# Altium PCB SSB23_rev0.PcbDoc (part 1 of 3)
Units mil, origin at the board's own origin, x right, y up, seen from the top; angles counter-clockwise.
Board outline 4555 x 3775 mil, 2 copper layers (Top Layer, Bottom Layer); 91 components, 73 nets, 352 pads, 879 vias.
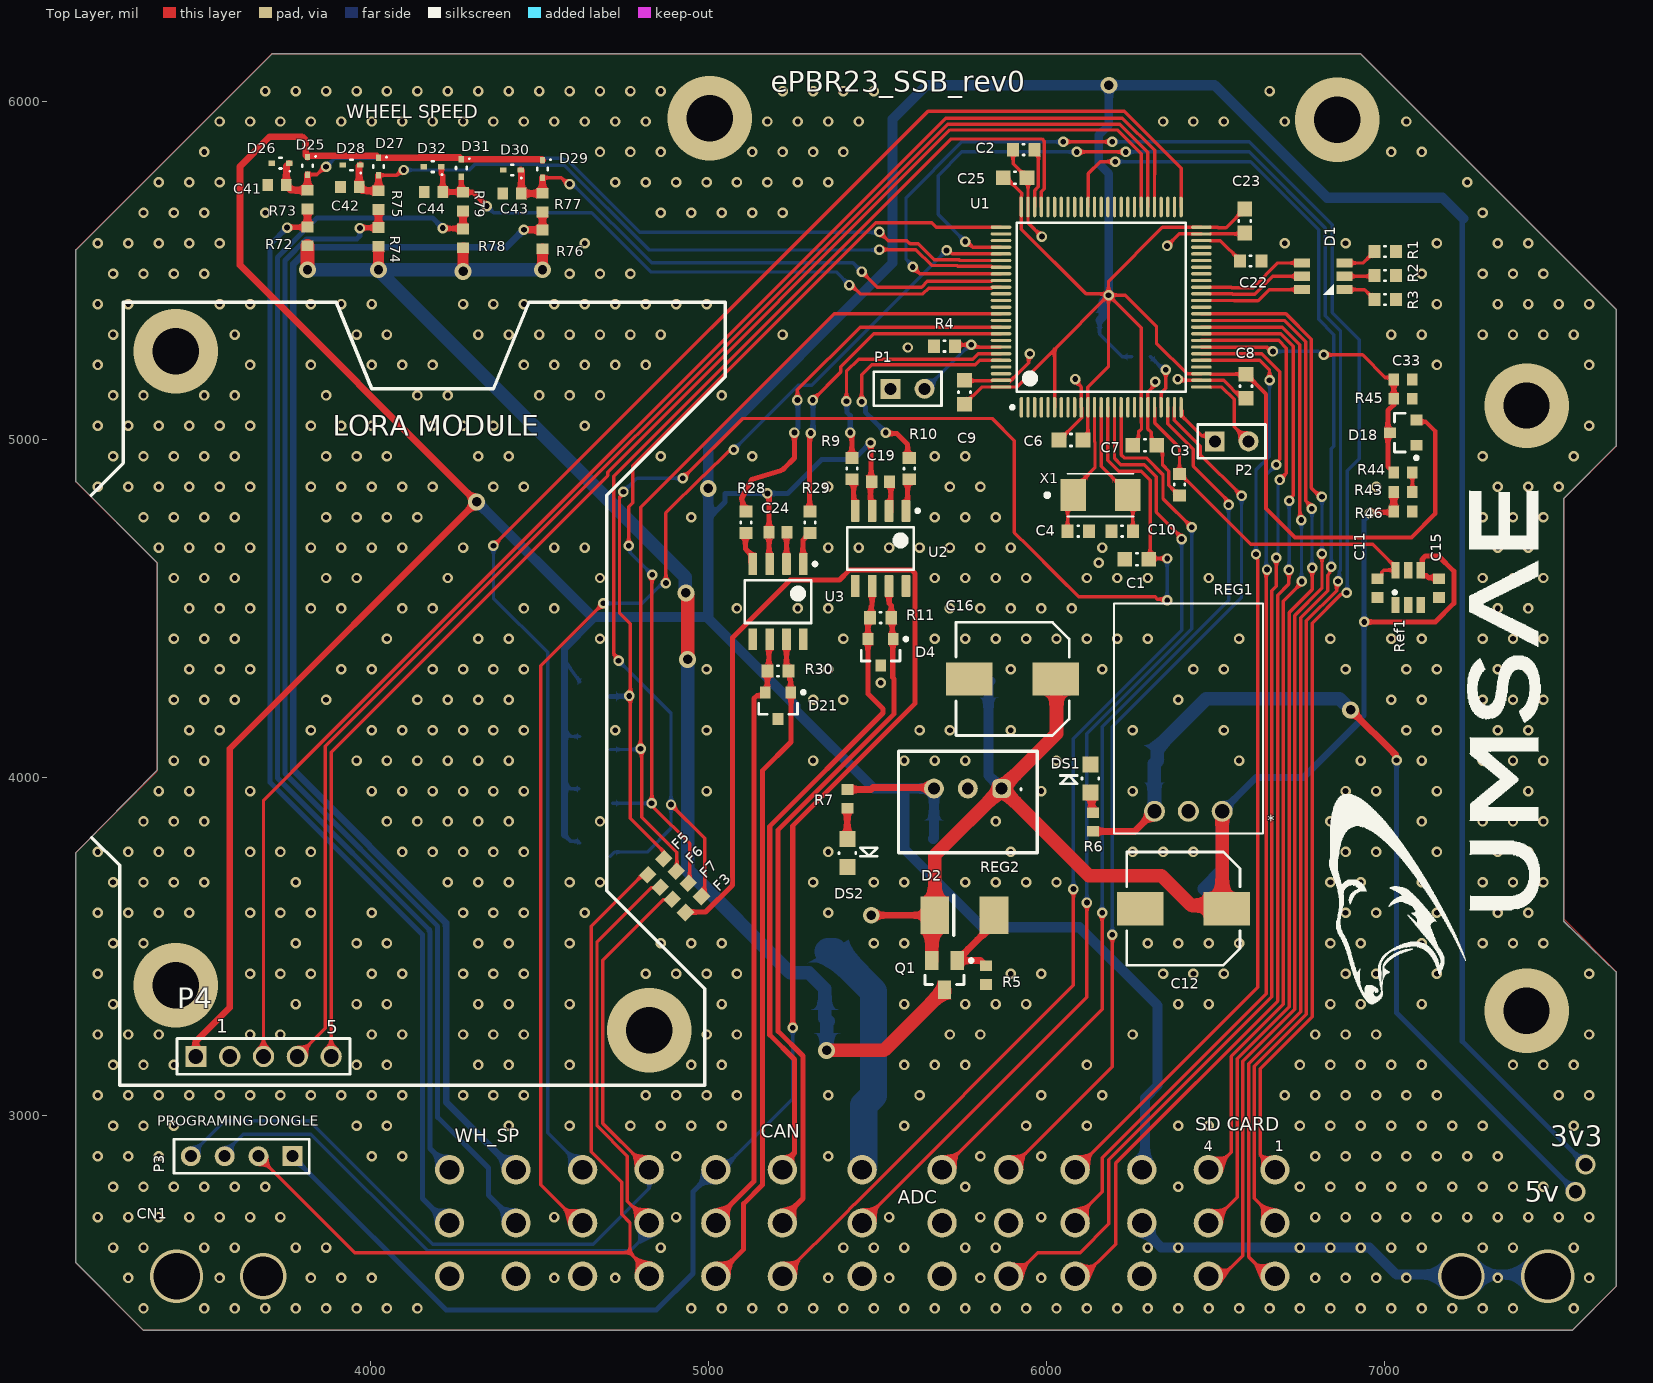
[diagram p0: Top Layer view]
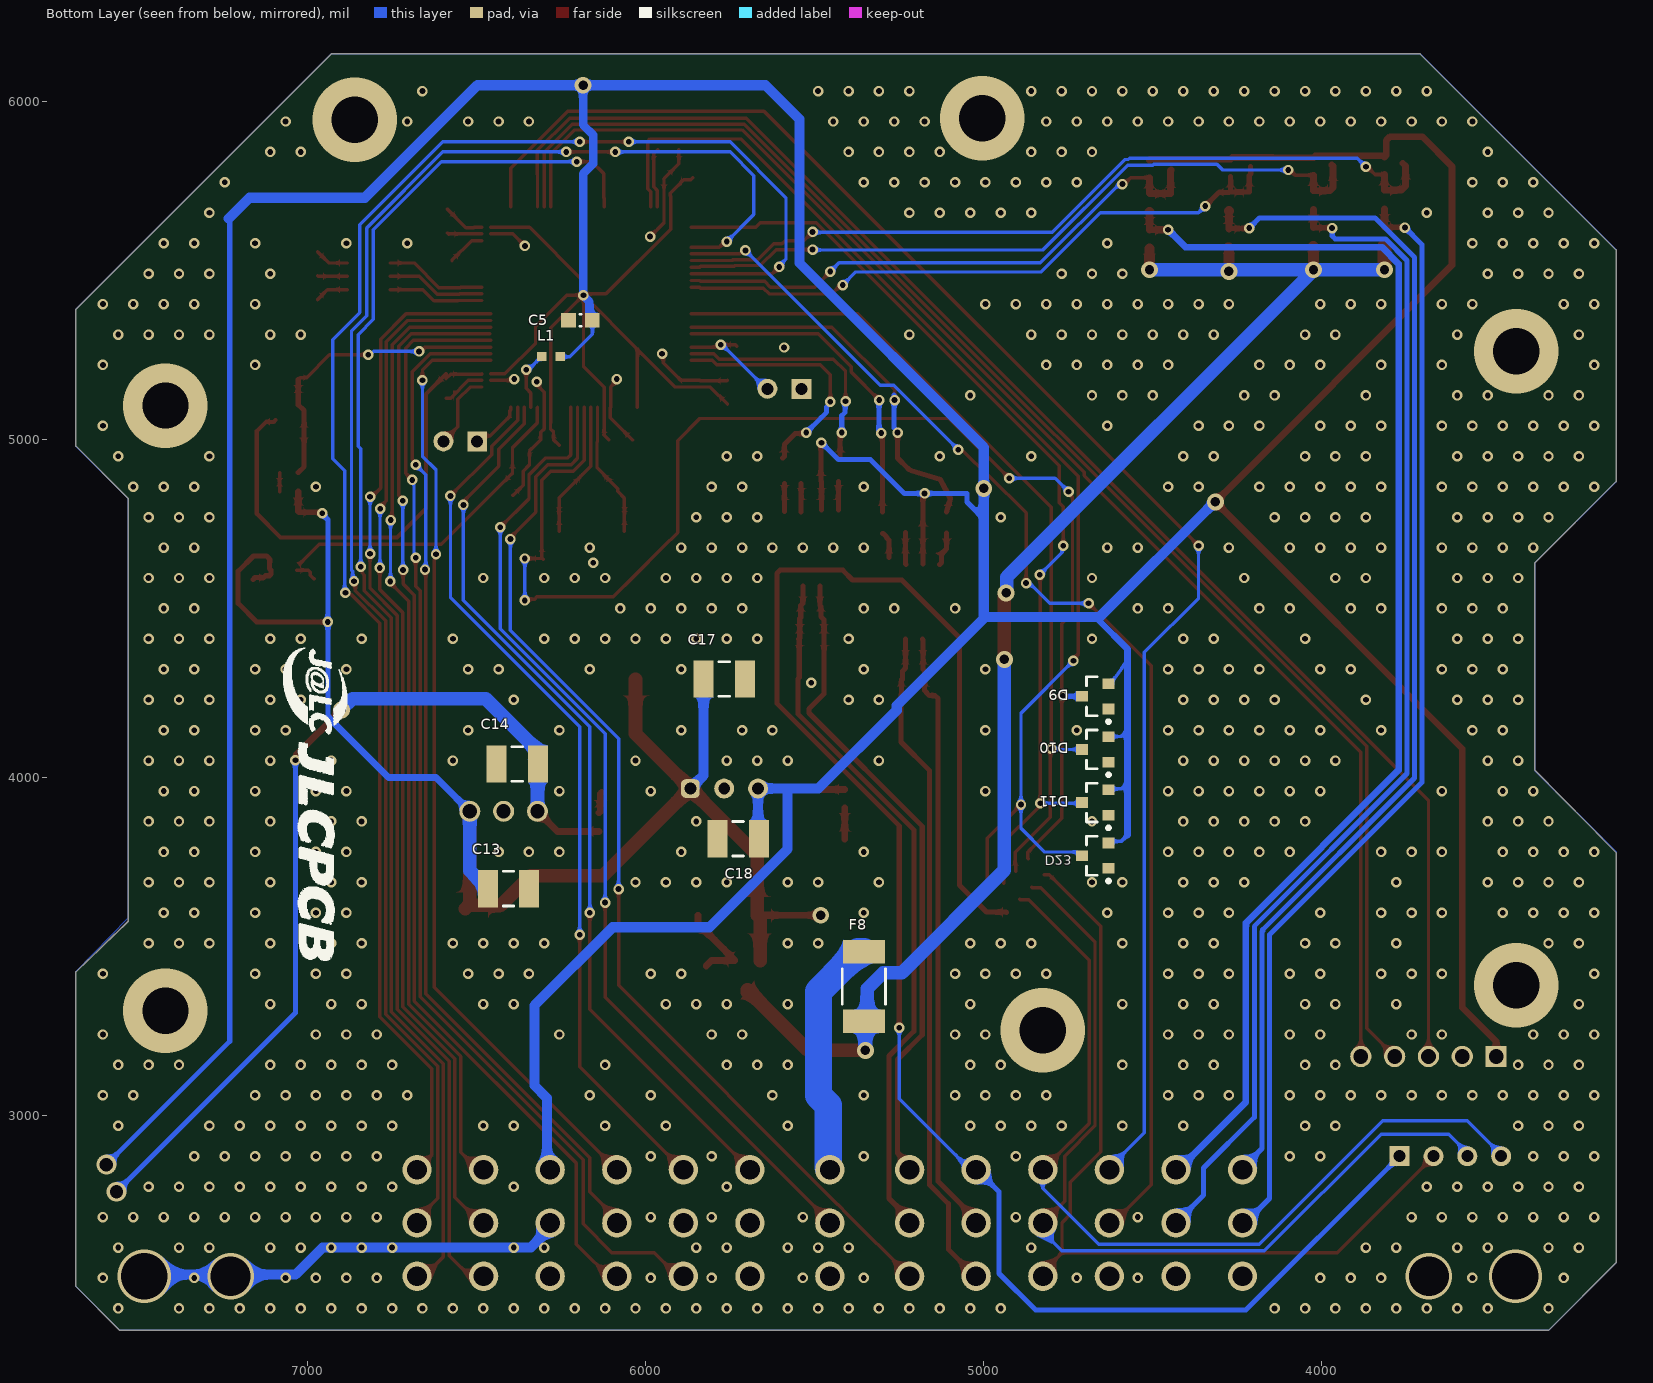
[diagram p1: Bottom Layer view, seen from below]

## Layer stack, top to bottom
Top Solder: solder mask 0.4, Solder Resist, Dk 3.5
Top Layer: signal copper 1.4
Dielectric 1: dielectric 12.6, FR-4, Dk 4.8
Bottom Layer: signal copper 1.4
Bottom Solder: solder mask 0.4, Solder Resist, Dk 3.5

## Board outline
7685,4980 7530,4825 7530,3575 7685,3425 7685,2495 7555,2365 3330,2365 3130,2565 3130,3778.16 3370,4021.69 3370,4635 3130,4875 3130,5560 3710,6140 6930,6140 7685,5385

## Design rules (kind name [scope] priority, off if disabled: settings)
Clearance [All] p1: gap=7 ignorepadtopadclearanceinfootprint=FALSE except(0: Arc-Hole Track-Hole SMDPad-Hole THPad-Hole Via-Hole Fill-Hole Poly-Hole Region-Hole Text-Hole)
DiffPairsRouting [All] p1: maxlimit=10 minlimit=10 mostfreqgap=10 toplayer_minwidth=15 toplayer_maxwidth=15 toplayer_prefwidth=15 bottomlayer_minwidth=15 bottomlayer_maxwidth=15 bottomlayer_prefwidth=15 maxuncoupledlength=500
Height [All] p1: minheight=0 maxheight=39370.08 prefheight=500
HoleSize [All] p1: absolutevalues=TRUE maxlimit=200 minlimit=15 maxpercent=80.000 minpercent=20.000
HoleToHoleClearance [All] p1: gap=8 allowstackedmicrovias=TRUE
MinimumAnnularRing MinimumAnnularRing_Pad [IsPad] p1: minimumring=7
MinimumAnnularRing MinimumAnnularRing_Via [IsVia] p2: minimumring=5
MinimumSolderMaskSliver [All] p1: minsoldermaskwidth=4
PlaneClearance [All] p1: clearance=15
PlaneConnect PlaneConnect_12V [InNet('12V')] p1: planeconnectstyle=Direct reliefexpansion=20 reliefentries=4 reliefconductorwidth=20 reliefairgap=10
PlaneConnect PlaneConnect_1 [All] p2: planeconnectstyle=Relief reliefexpansion=15 reliefentries=4 reliefconductorwidth=15 reliefairgap=10
PolygonConnect [All] p1: connectstyle=Direct reliefconductorwidth=15 reliefentries=4 polygonreliefangle="90 Angle" airgapwidth=10
RoutingVias [All] p1: holewidth=17 width=31 viastyle="Through Hole" minholewidth=15 minwidth=29 maxholewidth=50 maxwidth=100
SilkToSilkClearance [All] p1: silktosilkclearance=7
SilkToSolderMaskClearance [IsPad] p1: minsilkscreentomaskgap=2 clearancetoexposedcopper=TRUE
SolderMaskExpansion [All] p1: expansion=3 istentingtop=FALSE
Width [All] p1: maxlimit=200 minlimit=7 preferedwidth=15
21 further rules are at their usual default settings.

## Classes and differential pairs
component class 6-Sensors: C41 C42 C43 C44 D25 D26 D27 D28 D29 D30 D31 D32 R72 R73 R74 R75 R76 R77 R78 R79
component class 7-Fusing: F8
component class 8-Other_Inputs: C33 D18 R43 R44 R45 R46
component class 5-LORA: P4
component class 4-Connector: CN1 D9 D10 D11 D23 F3 F5 F6 F7 P3
component class 3-CAN: C19 C24 D4 D21 R9 R10 R11 R28 R29 R30 U2 U3
component class 2-Power: C11 C12 C13 C14 C15 C16 C17 C18 D2 DS1 DS2 Q1 R5 R6 R7 Ref1 REG1 REG2
component class 1-Controller: C1 C2 C3 C4 C5 C6 C7 C8 C9 C10 C22 C23 C25 D1 L1 P1 P2 R1 R2 R3 R4 U1
differential pair Sensor_CAN: +Sensor_CAN_P -Sensor_CAN_N
differential pair CAN: +CAN_P -CAN_N

## Components (designator, comment, footprint, x,y, rotation, side; value= is the part's Value field where it differs from the comment)
C1 "CAP 10nF 100V 0603(1608)" CAPC0603(1608)100_M 6267.72,4645.5 r0 top value=10nF
C2 "CAP 2.2uF" CAPC0603(1608)55_N 5933.07,5856.63 r0 top value=2.2uF
C3 "CAP 100nF 25V 0603(1608)" CAPC0603(1608)100_N 6393.7,4866.14 r90 top value=100nF
C4 "CAP 24pF" CAPC0603(1608)100_N 6094.32,4728.35 r180 top value=24pF
C5 "CAP 10nF 100V 0603(1608)" CAPC0603(1608)100_M 6192.91,5352.36 r180 bottom value=10nF
C6 "CAP 10nF 100V 0603(1608)" CAPC0603(1608)100_M 6072.83,4998.03 r0 top value=10nF
C7 "CAP 10nF 100V 0603(1608)" CAPC0603(1608)100_M 6291.34,4982.28 r180 top value=10nF
C8 "CAP 10nF 100V 0603(1608)" CAPC0603(1608)100_M 6590.55,5157.48 r90 top value=10nF
C9 "CAP 10nF 100V 0603(1608)" CAPC0603(1608)100_M 5757.87,5139.76 r270 top value=10nF
C10 "CAP 24pF" CAPC0603(1608)100_N 6224.41,4728.35 r0 top value=24pF
C11 "Cap" 1608[0603] 6979.28,4560 r90 top value=1uF
C12 "UUD1H101MNL1GS" NIC-CAPA2-8X10_V 6405.51,3612.2 r180 top
C13 "Cap" C1210_M 6405.51,3671.26 r0 bottom value=22uF
C14 "Cap" C1210_M 6380,4040 r180 bottom value=10uF
C15 "Cap" 1608[0603] 7160.72,4560 r90 top value=100nF
C16 "UUD1H101MNL1GS" NIC-CAPA2-8X10_V 5900,4291.34 r180 top
C17 "Cap" C1210_M 5767.72,4291.34 r0 bottom value=22uF
C18 "Cap" C1210_M 5726.38,3818.9 r180 bottom value=10uF
C19 "0.1uF" CAPC1608X90X30NL10T20 5509.81,4874.47 r180 top
C22 "CAP 2.2uF 10V 0603(1608)" CAPC0603(1608)55_N 6604.33,5527.56 r180 top value=2.2uF
C23 "CAP 10nF 100V 0603(1608)" CAPC0603(1608)100_M 6586.61,5645.84 r90 top value=10nF
C24 "0.1uF" CAPC1608X90X30NL10T20 5206.57,4725 r180 top
C25 "CAP 10nF 100V 0603(1608)" CAPC0603(1608)100_M 5907.48,5773.79 r180 top value=10nF
C33 "Cap" 1608[0603] 7055,5177.31 r180 top value=0.47uF
C41 "Cap" 1608[0603] 3725,5751.56 r0 top value=100pF
C42 "Cap" 1608[0603] 3940,5746.56 r0 top value=100pF
C43 "Cap" 1608[0603] 4420,5726.56 r0 top value=100pF
C44 "Cap" 1608[0603] 4187.44,5731.56 r0 top value=100pF
CN1 "5-1418363-3" 5-1418363-3 5455.47,2682.52 r0 top
D1 "CLX6F-FKC-CNP1ST1E1BB7D3D3" CLX6C-FKB 6881.89,5482.28 r180 top
D2 "Zener Diode, 5.1V, 5W SMBJ5338B" "DO-214AA (SMB)" 5757.87,3592.52 r180 top
D4 "NUP2105LT1" ONSC-SOT-23-3-318-08_V 5509.81,4370.03 r270 top
D9 "SZNUP1301ML3T1G" ONSC-SOT-23-3-318-08_V 4670.63,4240 r0 bottom
D10 "SZNUP1301ML3T1G" ONSC-SOT-23-3-318-08_V 4670.63,4082.94 r0 bottom
D11 "SZNUP1301ML3T1G" ONSC-SOT-23-3-318-08_V 4670.63,3925.89 r0 bottom
D18 "SZNUP1301ML3T1G" ONSC-SOT-23-3-318-08_V 7055,5020 r180 top
D21 "NUP2105LT1" ONSC-SOT-23-3-318-08_V 5206.57,4212.69 r270 top
D23 "SZNUP1301ML3T1G" ONSC-SOT-23-3-318-08_V 4670.63,3768.83 r0 bottom
D25 "RB521S30T1G" ONSC-SOD-523-2-502-01_V 3815,5809.01 r270 top
D26 "RB521S30T1G" ONSC-SOD-523-2-502-01_V 3735,5816.56 r180 top
D27 "RB521S30T1G" ONSC-SOD-523-2-502-01_V 4025,5807.02 r270 top
D28 "RB521S30T1G" ONSC-SOD-523-2-502-01_V 3945,5811.56 r180 top
D29 "RB521S30T1G" ONSC-SOD-523-2-502-01_V 4510,5799.58 r270 top
D30 "RB521S30T1G" ONSC-SOD-523-2-502-01_V 4420,5796.56 r180 top
D31 "RB521S30T1G" ONSC-SOD-523-2-502-01_V 4270,5802.55 r270 top
D32 "RB521S30T1G" ONSC-SOD-523-2-502-01_V 4185,5806.56 r180 top
DS1 "LTST-C170GKT" LTST-C170GKT_V 6129.92,3997.21 r90 top
DS2 "LTST-C170GKT" LTST-C170GKT_V 5411.42,3776.21 r270 top
F3 "PTC 80 mA" "0603 fuse" 4956.59,3624.37 r225 top
F5 "PTC 80 mA" "0603 fuse" 4845.05,3735.91 r225 top
F6 "PTC 80 mA" "0603 fuse" 4881.42,3699.53 r225 top
F7 "PTC 80 mA" "0603 fuse" 4917.8,3663.16 r225 top
F8 "1812L075/24DR" LFUS-1812L07524DR_V 5354.33,3381.89 r270 bottom
L1 "MH1608-601Y" BOUR-MH1608_V 6280,5245 r0 bottom
P1 "Header 2" HDR1X2 5539.76,5149.61 r0 top
P2 "Header 2" HDR1X2 6498.03,4994.09 r0 top
P3 "Header 4" HDR1X4 3770,2880 r180 top
P4 "61300511121" 61300511121 3685,3175 r0 top
Q1 "FDN340P" FAIR-SSOT3L-3_V 5698.82,3415.35 r270 top
R1 "82R" RESC0603(1608)_N 7001.97,5555.45 r0 top value="82.00 Ohm"
R2 "60R" RESC0603(1608)_N 7001.97,5484.42 r0 top value="60.40 Ohm"
R3 "33R" RESC0603(1608)_N 7001.97,5413.39 r0 top value="33.00 Ohm"
R4 "10K" RESC0603(1608)_N 5698.82,5275.59 r180 top value="10000.00 Ohm"
R5 "Res1" 1608[0603] 5821.03,3415.35 r90 top value=1K
R6 "Res1" 1608[0603] 6137.96,3868.11 r90 top value=180R
R7 "Res1" 1608[0603] 5411.42,3937.01 r270 top value=82R
R9 "22R" RESC0603(1608)_N 5425,4913.5 r90 top value="22.00 Ohm"
R10 "22R" RESC0603(1608)_N 5594.63,4913.5 r90 top value="22.00 Ohm"
R11 "120R" RESC0603(1608)_N 5509.81,4472.56 r0 top value="120.00 Ohm"
R28 "22R" RESC0603(1608)_N 5111.92,4754.53 r90 top value="22.00 Ohm"
R29 "22R" RESC0603(1608)_N 5301.23,4754.53 r90 top value="22.00 Ohm"
R30 "120R" RESC0603(1608)_N 5206.57,4315.22 r0 top value="120.00 Ohm"
R43 "Res1" 1608[0603] 7055,4844.47 r0 top value=39k
R44 "Res1" 1608[0603] 7055,4901.72 r180 top value=2k
R45 "Res1" 1608[0603] 7055,5120.06 r180 top value=10k
R46 "Res1" 1608[0603] 7055,4787.21 r180 top value=10k
R72 "Res1" 1608[0603] 3815,5600.57 r270 top value=1K
R73 "Res1" 1608[0603] 3815,5709.01 r90 top value=1K
R74 "Res1" 1608[0603] 4025,5599.01 r270 top value=1K
R75 "Res1" 1608[0603] 4025,5707.44 r90 top value=1K
R76 "Res1" 1608[0603] 4510,5591.56 r270 top value=1K
R77 "Res1" 1608[0603] 4510,5700 r90 top value=1K
R78 "Res1" 1608[0603] 4275,5594.54 r270 top value=1K
R79 "Res1" 1608[0603] 4275,5702.97 r90 top value=1K
Ref1 "LT6654AHS6-3.3" "TSOT-23 S6" 7070,4560 r90 top
REG1 "OKI-78SR-5" "OKI-78SR-5/1.5-W - Horizontal" 6520,3900 r180 top
REG2 "OKI-78SR-3.3" "Reg - TH, 3 pin, 100 mil Pitch, VTL" 5767.72,3917.32 r180 top
U1 "STM32F446VET7" STM-LQFP100_L 6162.24,5390.98 r90 top
U2 "SN65HVD232DR" D0008A_M 5509.81,4677.45 r270 top
U3 "SN65HVD232DR" D0008A_M 5206.57,4520.11 r270 top
X1 "Comment" XTAL_ECS-80-18-30-JGN-TR 6160,4835 r0 top

## Footprints (in the part's own frame and the unit in brackets; to place one, negate y for a bottom-side part, rotate by r counter-clockwise, add the part's x,y. Pads: shape width x height; smd on the part's side, far side on the other; paste and mask are expansions set on the pad)
5-1418363-3 [mm] "Levyseal 90 degree 39 pin header"
  round 2.2 hole 1.5: 1(31,4) 2(31,0) 3(31,-4) 4(26,4) 5(26,0) 6(26,-4) 7(21,4) 8(21,0) 9(21,-4) 10(16,4) 11(16,0) 12(16,-4) 13(11,4) 14(11,0) 15(11,-4) 16(6,4) 17(6,0) 18(6,-4) 19(0,4) 20(0,0) 21(0,-4) 22(-6,4) 23(-6,0) 24(-6,-4) 25(-11,4) 26(-11,0) 27(-11,-4) 28(-16,4) 29(-16,0) 30(-16,-4) 31(-21,4) 32(-21,0) 33(-21,-4) 34(-26,4) 35(-26,0) 36(-26,-4) 37(-31,4) 38(-31,0) 39(-31,-4)
  body extent -66,-47.4 66,10.4, height 37
"0603 fuse" [mm] "0603 PTC fuse"
  rect 1x0.9 smd: 1(-0.85,0) 2(0.85,0)
  body extent -1,-0.41 1,0.41, height 0.7
1608[0603] [mm] "Chip Capacitor, Body 1.6x0.8mm, IPC High Density"
  rect 0.8x0.9 smd: 1(-0.7,0) 2(0.7,0)
  body extent -0.87,-0.48 0.87,0.48, height 1.3
61300511121 [mm] "Pin Header, pitch 2.54 mm, THT, Vertical, single row, 5p"
  rect 1.6x1.6 hole 1.1: 1(-5.08,0)
  round 1.6 hole 1.1: 2(-2.54,0) 3(0,0) 4(2.54,0) 5(5.08,0)
  silkscreen extent -6.5,-1.35 6.5,1.35, body extent -6.35,-1.27 6.35,1.27, height 8.57
BOUR-MH1608_V [mm] "Chip Bead, 2-Leads, Body 1.6x0.8mm"
  rect 0.7x0.7 smd: 1(-0.7,0) 2(0.7,0)
  body extent -0.8,-0.38 0.8,0.42, height 0.8
C1210_M [mm] "Chip Capacitor, Body 3.2x2.5mm, IPC Low Density"
  rect 1.5x2.8 smd: 1(-1.55,0) 2(1.55,0)
  silkscreen extent -0.4,-1.3 0.4,1.3, body extent -1.7,-1.35 1.7,1.35, height 1.5
CAPC0603(1608)55_N [mm] "Chip Capacitor, Body 1.6x0.8mm, Height 0.55mm, IPC Medium Density"
  rect 0.9x1 smd: 1(-0.8,0) 2(0.8,0)
  silkscreen extent -0.05,-0.4 0.05,0.4, body extent -0.87,-0.48 0.88,0.47, height 0.55
CAPC0603(1608)100_M [mm] "Chip Capacitor, Body 1.6x0.8mm, Height 1.0mm, IPC Low Density"
  rect 1.1x1.1 smd: 1(-0.9,0) 2(0.9,0)
  silkscreen extent -0.05,-0.45 0.05,0.45, body extent -0.87,-0.47 0.88,0.48, height 1
CAPC0603(1608)100_N [mm] "Chip Capacitor, Body 1.6x0.8mm, Height 1.0mm, IPC Medium Density"
  rect 0.9x1 smd: 1(-0.8,0) 2(0.8,0)
  silkscreen extent -0.05,-0.4 0.05,0.4, body extent -0.87,-0.48 0.88,0.47, height 1
CAPC1608X90X30NL10T20 [mm] "Chip Capacitor, 2-Leads, Body 1.70x0.90mm, IPC Medium Density"
  rect 0.85x0.95 smd: 1(-0.675,0) 2(0.675,0)
  body extent -0.85,-0.45 0.85,0.45, height 0.9
CLX6C-FKB [mm] "6-SMD, J-Lead, 1mm"
  rect 1.2x0.7 smd: 1(0,1) 2(0,0) 3(0,-1) 4(3.2,-1) 5(3.2,0) 6(3.2,1)
  silkscreen extent 0.8,0.6 1.6,1.4, body extent -0.1,-1.7 3.3,1.7, height 1
D0008A_M [mm] "SOIC, 8-Leads, Body 5x4mm, Pitch 1.27mm, IPC Low Density"
  rrect15% 1.65x0.65 smd: 1(-2.825,1.905) 2(-2.825,0.635) 3(-2.825,-0.635) 4(-2.825,-1.905) 5(2.825,-1.905) 6(2.825,-0.635) 7(2.825,0.635) 8(2.825,1.905)
  silkscreen extent -2.95,-2.5 1.6,2.91, body extent -3,-2.45 3,2.45, height 1.63
"DO-214AA (SMB)" [mm]
  rect 2.16x2.8 smd: A(-2.225,0) K(2.225,0)
  silkscreen extent 0.8,-1.5 0.8,1.5, body extent -2.87,-1.95 2.88,1.95, height 2.41
FAIR-SSOT3L-3_V [mm] "SOT23, 3-Leads, Body 2.92x1.4mm, Pitch 0.95mm"
  rect 1.4x1 smd: 1(-1.1,0.95) 2(-1.1,-0.95) 3(1.1,0)
  silkscreen extent -1.22,-1.46 0.7,2.13, body extent -1.26,-1.46 1.26,1.46, height 1.12
HDR1X2 [mm] "Connector; Header; 2 Position"
  rect 1.5x1.5 hole 0.9: 1(0,0)
  round 1.5 hole 0.9: 2(2.54,0)
  silkscreen extent -1.27,-1.27 3.81,1.27
HDR1X4 [mm] "Connector; Header; 4 Position"
  rect 1.5x1.5 hole 0.9: 1(0,0)
  round 1.5 hole 0.9: 2(2.54,0) 3(5.08,0) 4(7.62,0)
  silkscreen extent -1.27,-1.27 8.89,1.27
LFUS-1812L07524DR_V [mm] "SMD, 2-Leads, Body 4.55x3.24mm"
  rect 1.78x3.15 smd: 1(-2.615,0) 2(2.615,0)
  silkscreen extent -1.33,-1.62 1.33,1.62, body extent -2.27,-1.62 2.27,1.62, height 1.55
LTST-C170GKT_V [mm] "SMD, 2-Leads, Body 2x1.25mm"
  rect 1.2x1.2 smd: 1(-1.05,0) 2(1.05,0)
  silkscreen extent -0.41,-0.63 0.23,2.25, body extent -1,-0.63 1,0.63, height 1.1
NIC-CAPA2-8X10_V [mm] "Aluminum Electrolytic Capacitor, Diameter 8mm, Height 10.8mm, Pitch 6.5mm"
  rect 3.5x2.5 smd: 1(-3.25,0) 2(3.25,0)
  silkscreen extent -4.25,-4.25 4.25,4.25, body extent -3.99,-3.97 3.99,4, height 10.8
"OKI-78SR-5/1.5-W - Horizontal" [mil]
  round 62 hole 42 mask-1000: 1(0,0) 2(100,0) 3(200,0)
  silkscreen extent -120,-615 320,65, body extent -115,-615 315,55, height 340
ONSC-SOD-523-2-502-01_V [mm] "SOD, 2-Leads, Body 1.2x0.8mm"
  rect 0.48x0.4 smd: 1(-0.66,0) 2(0.66,0)
  silkscreen extent -0.75,-0.4 0.07,0.65, body extent -0.6,-0.4 0.6,0.4, height 0.7
ONSC-SOT-23-3-318-08_V [mm] "SOT23, 3-Leads, Body 2.92x1.3mm, Pitch 0.95mm"
  rect 0.9x0.8 smd: 1(-1,0.95) 2(-1,-0.95) 3(1,0)
  silkscreen extent -1.12,-1.46 0.65,2.03, body extent -0.65,-1.46 0.65,1.46, height 1.11
"Reg - TH, 3 pin, 100 mil Pitch, VTL" [mm] "OKI-78SR"
  rrect50% 1.4x1.4 hole 0.889: 1(-2.54,-1.27)
  round 1.5 hole 0.889: 2(0,-1.27) 3(2.54,-1.27)
  silkscreen extent -5.21,-4.06 5.21,3.56, body extent -5.21,-4.05 5.21,3.68, height 16.51
RESC0603(1608)_N [mm] "Chip Resistor, Body 1.6x0.8mm, IPC Medium Density"
  rect 0.9x1 smd: 1(-0.8,0) 2(0.8,0)
  silkscreen extent -0.05,-0.4 0.05,0.4, body extent -0.85,-0.47 0.85,0.47, height 0.6
STM-LQFP100_L [mm] "Thin QFP, 100-Leads, Body 14x14mm, Pitch 0.5mm, IPC High Density"
  oval 1.55x0.25 smd: 1(-7.525,6) 2(-7.525,5.5) 3(-7.525,5) 4(-7.525,4.5) 5(-7.525,4) 6(-7.525,3.5) 7(-7.525,3) 8(-7.525,2.5) 9(-7.525,2) 10(-7.525,1.5) 11(-7.525,1) 12(-7.525,0.5) 13(-7.525,0) 14(-7.525,-0.5) 15(-7.525,-1) 16(-7.525,-1.5) 17(-7.525,-2) 18(-7.525,-2.5) 19(-7.525,-3) 20(-7.525,-3.5) 21(-7.525,-4) 22(-7.525,-4.5) 23(-7.525,-5) 24(-7.525,-5.5) 25(-7.525,-6) 51(7.525,-6) 52(7.525,-5.5) 53(7.525,-5) 54(7.525,-4.5) 55(7.525,-4) 56(7.525,-3.5) 57(7.525,-3) 58(7.525,-2.5) 59(7.525,-2) 60(7.525,-1.5) 61(7.525,-1) 62(7.525,-0.5) 63(7.525,0) 64(7.525,0.5) 65(7.525,1) 66(7.525,1.5) 67(7.525,2) 68(7.525,2.5) 69(7.525,3) 70(7.525,3.5) 71(7.525,4) 72(7.525,4.5) 73(7.525,5) 74(7.525,5.5) 75(7.525,6)
  oval 0.25x1.55 smd: 26(-6,-7.525) 27(-5.5,-7.525) 28(-5,-7.525) 29(-4.5,-7.525) 30(-4,-7.525) 31(-3.5,-7.525) 32(-3,-7.525) 33(-2.5,-7.525) 34(-2,-7.525) 35(-1.5,-7.525) 36(-1,-7.525) 37(-0.5,-7.525) 38(0,-7.525) 39(0.5,-7.525) 40(1,-7.525) 41(1.5,-7.525) 42(2,-7.525) 43(2.5,-7.525) 44(3,-7.525) 45(3.5,-7.525) 46(4,-7.525) 47(4.5,-7.525) 48(5,-7.525) 49(5.5,-7.525) 50(6,-7.525) 76(6,7.525) 77(5.5,7.525) 78(5,7.525) 79(4.5,7.525) 80(4,7.525) 81(3.5,7.525) 82(3,7.525) 83(2.5,7.525) 84(2,7.525) 85(1.5,7.525) 86(1,7.525) 87(0.5,7.525) 88(0,7.525) 89(-0.5,7.525) 90(-1,7.525) 91(-1.5,7.525) 92(-2,7.525) 93(-2.5,7.525) 94(-3,7.525) 95(-3.5,7.525) 96(-4,7.525) 97(-4.5,7.525) 98(-5,7.525) 99(-5.5,7.525) 100(-6,7.525)
  silkscreen extent -7.65,-6.35 6.35,6.8, body extent -7,-7 7,7, height 1.6
"TSOT-23 S6" [mm]
  rect 1.22x0.62 smd: 1(-1.27,0.95) 2(-1.27,0) 3(-1.27,-0.95) 4(1.35,-0.95) 5(1.35,0) 6(1.35,0.95)
  silkscreen extent -0.43,0.9 -0.21,1.12, body extent -0.85,-1.45 0.89,1.45, height 1
XTAL_ECS-80-18-30-JGN-TR [mm]
  rect 1.9x2.4 smd: 1(-2.05,0) 2(2.05,0)
  silkscreen extent -4.14,-1.6 2.5,1.6

## Part data
C1 C5 C6 C7 C8 C9 C23 C25: library part CMP-1035-02326-1, "CAP 10nF 100V ±20% 0603 (1608 Metric) Thickness 1mm SMD", Case-EIA=0603, Case-Metric=1608, Rated Voltage="100 V", Tolerance=Â±20%, Max Thickness="1 mm", Technology=SMT
C2 C22: library part CMP-1035-02757-1, "CAP 2.2uF 10V ±10% 0603 (1608 Metric) Thickness 0.55mm SMD", Case-EIA=0603, Case-Metric=1608, Rated Voltage="10 V", Supplier Part Number 1=490-4520-1-ND, Tolerance=Â±10%, Max Thickness="0.55 mm", Supplier 1=Digi-Key, Technology=SMT
C3: library part CMP-1035-02589-1, "CAP 100nF 25V ±20% 0603 (1608 Metric) Thickness 1mm SMD", Case-EIA=0603, Case-Metric=1608, Rated Voltage="25 V", Tolerance=Â±20%, Max Thickness="1 mm", Technology=SMT
C4 C10: library part CMP-1035-00843-1, "CAP 24pF 16V ±2% 0603 (1608 Metric) Thickness 1mm SMD", Case-EIA=0603, Case-Metric=1608, Rated Voltage="16 V", Tolerance=Â±2%, Max Thickness="1 mm", Technology=SMT
C11: "Capacitor", Capacitance=1µF, Manufacturer="Murata Electronics North America", Manufacturer Part Number=GRM188R61E105KA12D, Operating Temperature="-55°C ~ 85°C", Package / Case="0603 (1608 Metric)", Ratings=-, Supplier Part Number 1=490-3897-1-ND, Temperature Coefficient=X5R, Tolerance=±10%, Voltage - Rated=25V, Applications="General Purpose", Category=Capacitors, ComponentLink1Description=http://www.murata.com/~/media/webrenewal/support/library/catalog/products/capacitor/mlcc/c02e.pdf, ComponentLink1URL=http://www.murata.com/~/media/webrenewal/support/library/catalog/products/capacitor/mlcc/c02e.pdf, Features=-, Height - Seated (Max)=-, Lead Spacing=-, Lead Style=-, Mounting Type="Surface Mount, MLCC", Packaging="Cut Tape (CT)", Part Status=Active, Pricing 1="1=0.15, 10=0.053, 50=0.0288, 100=0.0242, 250=0.01984, 500=0.01696, 1000=0.0132 (CAD)", RoHS="RoHS Compliant", Size / Dimension="0.063\" L x 0.031\" W (1.60mm x 0.80mm)", Stock 1=4259407, Supplier 1=Digi-Key, Thickness (Max)="0.035\" (0.90mm)"
C12 C16: library part CMP-0687-00073-1, "Aluminum Electrolytic Capacitor, UD Series, Low Impedance, 100 uF, 50 V, + / - 20%, -55 to 105 degC, Chip Type, 8 x 10 mm D x L, Pb-Free, Reel", Capacitance=100µF, ESR (Equivalent Series Resistance)=-, Lifetime @ Temp.="5000 Hrs @ 105°C", Manufacturer=Nichicon, Operating Temperature="-55°C ~ 105°C", Package / Case="Radial, Can - SMD", Rated Capacitance="100 uF", Rated Ripple Current (at 100kHz)="300 mA", Rated Voltage="50 V", Ripple Current=300mA, Supplier Part Number 1=493-2306-1-ND, Tolerance=±20%, Tolerance Rated Capacitance="-20 to 20%", Voltage Rating=50V, Applications="General Purpose", Category=Capacitors, ComponentLink1Description="Manufacturer URL", ComponentLink1URL=http://www.nichicon.co.jp/, ComponentLink2Description=Datasheet, ComponentLink2URL=http://products.nichicon.co.jp/en/pdf/XJA043/e-ud.pdf, ComponentLink3Description="Package Specification", ComponentLink3URL=http://products.nichicon.co.jp/en/pdf/XJA043/e-ud.pdf, ComponentLink4Description=http://nichicon-us.com/english/products/pdfs/e-uud.pdf, ComponentLink4URL=http://nichicon-us.com/english/products/pdfs/e-uud.pdf, DatasheetVersion=08/2012, Diameter="8 mm", Endurance Time="5000 h", Height - Seated (Max)="0.394\" (10.00mm)", Impedance="0.34 Ohm", Lead Spacing=-, Length="10 mm", Manufacturer Part Number=UUD1H101MNL1GS, Mounting Technology="Surface Mount", Mounting Type="Surface Mount", PackageDescription="2-Pin Surface Mount Device, Diameter 8 mm, Height 10 mm, Pitch 6.5 mm", PackageReference=CAPAE-D8H10, Packaging="Cut Tape (CT)", Packing="Dia382mm Reel", PartNumber=UUD1H101MNL1GS, Part Status=Active, Polarization=Polar, Pricing 1="1=0.92, 10=0.685, 25=0.5868, 50=0.5478, 100=0.4696, 250=0.43044 (CAD)", RoHS=TRUE, Size / Dimension="0.315\" Dia (8.00mm)", Stock 1=65948, Supplier 1=Digi-Key, Surface Mount Land Size="0.327\" L x 0.327\" W (8.30mm x 8.30mm)"
C13 C17: "Capacitor", Capacitance=22µF, Manufacturer=Yageo, Manufacturer Part Number=CC1210MKX5R8BB226, Operating Temperature="-55°C ~ 85°C", Package / Case="1210 (3225 Metric)", Ratings=-, Supplier Part Number 1=311-2056-1-ND, Temperature Coefficient=X5R, Tolerance=±20%, Voltage - Rated=25V, Applications="General Purpose", Category=Capacitors, ComponentLink1Description=http://www.yageo.com/documents/recent/UPY-GPHC_X5R_4V-to-50V_23.pdf, ComponentLink1URL=http://www.yageo.com/documents/recent/UPY-GPHC_X5R_4V-to-50V_23.pdf, Failure Rate=-, Features=-, Height - Seated (Max)=-, Lead Spacing=-, Lead Style=-, Mounting Type="Surface Mount, MLCC", Packaging="Cut Tape (CT)", Part Status=Active, Pricing 1="1=1, 10=0.703, 25=0.5996, 50=0.5314, 100=0.4628, 250=0.39424 (CAD)", RoHS="RoHS Compliant", Size / Dimension="0.126\" L x 0.098\" W (3.20mm x 2.50mm)", Stock 1=128, Supplier 1=Digi-Key, Thickness (Max)="0.110\" (2.80mm)"
C14 C18: "Capacitor", Capacitance=10µF, Manufacturer=Yageo, Manufacturer Part Number=CC1210ZKY5V8BB106, Operating Temperature="-30°C ~ 85°C", Package / Case="1210 (3225 Metric)", Ratings=-, Supplier Part Number 1=311-2063-1-ND, Temperature Coefficient="Y5V (F)", Tolerance="-20%, +80%", Voltage - Rated=25V, Applications="General Purpose", Category=Capacitors, ComponentLink1Description=http://www.yageo.com/documents/recent/UPY-GPHC_Y5V_6.3V-to-50V_7.pdf, ComponentLink1URL=http://www.yageo.com/documents/recent/UPY-GPHC_Y5V_6.3V-to-50V_7.pdf, Failure Rate=-, Features=-, Height - Seated (Max)=-, Lead Spacing=-, Lead Style=-, Mounting Type="Surface Mount, MLCC", Packaging="Cut Tape (CT)", Part Status=Active, Pricing 1="1=0.47, 10=0.323, 25=0.258, 50=0.2154, 100=0.1829, 250=0.14528, 500=0.12912, 1000=0.11298 (CAD)", RoHS="RoHS Compliant", Size / Dimension="0.126\" L x 0.098\" W (3.20mm x 2.50mm)", Stock 1=1156, Supplier 1=Digi-Key, Thickness (Max)="0.083\" (2.10mm)"
C15: "Capacitor", Capacitance=0.10µF, Manufacturer=Yageo, Manufacturer Part Number=CC0603KRX7R9BB104, Operating Temperature="-55°C ~ 125°C", Package / Case="0603 (1608 Metric)", Ratings=-, Supplier Part Number 1=311-1344-1-ND, Temperature Coefficient=X7R, Tolerance=±10%, Voltage - Rated=50V, Applications="General Purpose", Category=Capacitors, ComponentLink1Description=http://www.yageo.com/documents/recent/UPY-GPHC_X7R_6.3V-to-50V_16.pdf, ComponentLink1URL=http://www.yageo.com/documents/recent/UPY-GPHC_X7R_6.3V-to-50V_16.pdf, Failure Rate=-, Features=-, Height - Seated (Max)=-, Lead Spacing=-, Lead Style=-, Mounting Type="Surface Mount, MLCC", Packaging="Cut Tape (CT)", Part Status=Active, Pricing 1="1=0.15, 10=0.043, 25=0.0312, 50=0.0232, 100=0.0189, 250=0.0158, 500=0.01346, 1000=0.01059 (CAD)", RoHS="RoHS Compliant", Size / Dimension="0.063\" L x 0.031\" W (1.60mm x 0.80mm)", Stock 1=4016262, Supplier 1=Digi-Key, Thickness (Max)="0.035\" (0.90mm)"
C19 C24: library part CMP-2000-06092-1, "Chip Capacitor, 100 nF, +/- 10%, 50 V, -55 to 125 degC, 0603 (1608 Metric), RoHS, Tape and Reel", Dielectric=X7R, Manufacturer=SamsungElectro-Mechanics, Operating Temperature=-55to125°C, Package/Case=0603, Package Description="2-Pin Surface Mount Device, Body 1.60 x 0.80 mm", Tolerance=10%, Voltage=50Vdc, Capacitance Value=0.1uF, Category=CapacitorCeramicMultilayer, Construction=Flat, Datasheet URL=http://www.samsungsem.com/kr/support/product-search/mlcc/__icsFiles/afieldfile/2016/08/18/S_CL10B104KB8SFNC.pdf, Datasheet Version=06/2016, Manufacturer URL=http://www.samsungsem.com/global/index.jsp, Mounting=SurfaceMount, Mounting Technology=SurfaceMount, Package Reference=0603, Packaging=Tape&Reel, Product Depth=0.8mm, Product Height=0.8mm, Product Length=1.6mm, Rad Hard=No
C33: "Capacitor", Capacitance=0.47µF, Manufacturer=Yageo, Manufacturer Part Number=CC0603KRX7R8BB474, Operating Temperature="-55°C ~ 125°C", Package / Case="0603 (1608 Metric)", Ratings=-, Supplier Part Number 1=311-1805-1-ND, Temperature Coefficient=X7R, Tolerance=±10%, Voltage - Rated=25V, Applications="General Purpose", Category=Capacitors, ComponentLink1Description=http://www.yageo.com/documents/recent/UPY-GPHC_X7R_6.3V-to-50V_16.pdf, ComponentLink1URL=http://www.yageo.com/documents/recent/UPY-GPHC_X7R_6.3V-to-50V_16.pdf, Failure Rate=-, Features=-, Height - Seated (Max)=-, Lead Spacing=-, Lead Style=-, Mounting Type="Surface Mount, MLCC", Packaging="Cut Tape (CT)", Part Status=Active, Pricing 1="1=0.22, 10=0.158, 25=0.1156, 50=0.0898, 100=0.0745, 250=0.06168, 500=0.05226, 1000=0.04324 (CAD)", RoHS="RoHS Compliant", Size / Dimension="0.063\" L x 0.031\" W (1.60mm x 0.80mm)", Stock 1=11076, Supplier 1=Digi-Key, Thickness (Max)="0.035\" (0.90mm)"
C41 C42 C43 C44: "Capacitor", LatestRevisionDate=17-Jul-2002, LatestRevisionNote="Re-released for DXP Platform.", PackageDescription="Radial Cap, Thru-Hole; 2 Leads; 0.3 in Pin Spacing", PackageReference=RAD-0.3, Published=8-Jun-2000, Publisher="Altium Limited"
CN1: "Levyseal 90 degree 39 pin header"
D1: library part "LED - CLX6F-FKC-CNP1ST1E1BB7D3D3", "Red, Green, Blue (RGB) 622nm Red, 530nm Green, 470nm Blue LED Indication - Discrete 2.1V Red, 2.7V Green, 3V Blue 6-SMD, J-Lead", ComponentLink1Description=Digikey, ComponentLink1URL=https://www.digikey.ca/product-detail/en/cree-inc/CLX6F-FKC-CNP1ST1E1BB7D3D3/CLX6F-FKC-CNP1ST1E1BB7D3D3CT-ND/6362814
D2: Part Number=SMBJ5338B, Power=5W, Reverse Voltage=5.1V
D4 D21: library part CMP-1063-00165-1, "Dual Line CAN Bus Protector, 3-Pin SOT-23, Tape and Reel", Manufacturer="On Semiconductor", C Max (pF)=30, ComponentLink1Description="Manufacturer URL", ComponentLink1URL=http://www.onsemi.com/, ComponentLink2Description=Datasheet, ComponentLink2URL=http://www.onsemi.cn/pub_link/Collateral/NUP2105L-D.PDF, ComponentLink3Description="Package Specification", ComponentLink3URL=http://www.onsemi.cn/pub_link/Collateral/318-08.PDF, DatasheetVersion="Rev. 5", Direction=Bidirectional, IR Max (uA)=0.1, Mounting Technology="Surface Mount", Number of Lines=2, PackageDescription="3-Pin Small Outline Transistor, Body 2.92 x 1.3 mm, Pitch 0.95 mm", PackageReference=SOT-23-3-318-08, PackageVersion="Rev. AP, 11/2009", Packing="Tape and Reel", PartNumber=NUP2105LT1, PPK Max (W)=350, V(BR) Min (V)=26.2
D9 D10 D11 D18 D23: library part CMP-1063-00171-1, "Low Capacitance Diode Array for ESD Protection in a Single Data Line, 3-Pin SOT-23, Pb-Free, Tape and Reel", Manufacturer="On Semiconductor", Supplier Part Number 1=863-SZNUP1301ML3T1G, C Max (pF)=0.9, ComponentLink1Description="Manufacturer URL", ComponentLink1URL=http://www.onsemi.com/, ComponentLink2Description=Datasheet, ComponentLink2URL=http://www.onsemi.cn/pub_link/Collateral/NUP1301ML3T1-D.PDF, ComponentLink3Description="Package Specification", ComponentLink3URL=http://www.onsemi.cn/pub_link/Collateral/318-08.PDF, DatasheetVersion="Rev. 6", Direction=Bidirectional, Mounting Technology="Surface Mount", Number of Lines=1, PackageDescription="3-Pin Small Outline Transistor, Body 2.92 x 1.3 mm, Pitch 0.95 mm", PackageReference=SOT-23-3-318-08, PackageVersion="Rev. AP, 11/2009", Packing="Tape and Reel", PartNumber=SZNUP1301ML3T1G, RoHS=Pb-Free, Supplier 1=Mouser, V(BR) Min (V)=70, VRWM Max (V)=70
D25 D26 D27 D28 D29 D30 D31 D32: library part CMP-1051-00018-1, "Schottky Barrier Diode, 2-Pin SOD-523, Pb-Free, Tape and Reel", Manufacturer="On Semiconductor", ComponentLink1Description="Manufacturer URL", ComponentLink1URL=http://www.onsemi.com/, ComponentLink2Description=Datasheet, ComponentLink2URL=http://www.onsemi.cn/pub_link/Collateral/RB521S30T1-D.PDF, ComponentLink3Description="Package Specification", ComponentLink3URL=http://www.onsemi.com/pub_link/Collateral/502-01.PDF, Configuration=Single, DatasheetVersion="Rev. 8", IFSM Max (A)=1, Mounting Technology="Surface Mount", PackageDescription="2-Pin SOD, Body 1.2 x 0.8 mm", PackageReference=SOD-523-2-502-01, PackageVersion="Rev. E, 09/2010", Packing="Tape and Reel", PartNumber=RB521S30T1G, RoHS=TRUE
DS1 DS2: library part CMP-1674-00002-5, "LED Uni-Color Green, 100 mW, 120 mA, -55 to 85 degC, 2-Pin SMD, RoHS, Tape and Reel", Color=Green, Current - Test=10mA, Lens Color=Colorless, Manufacturer=Lite-On, Max Operating Temperature="85 degC", Millicandela Rating=6mcd, Min Operating Temperature="-55 degC", Package / Case="0805 (2012 Metric)", Package Quantity=1, Supplier Device Package=-, Supplier Part Number 1=160-1179-1-ND, Voltage - Forward (Vf) (Typ)=2.1V, Category=Optoelectronics, Colour=Green, ComponentLink1Description="Manufacturer URL", ComponentLink1URL=http://www.us.liteon.com/, ComponentLink2Description=Datasheet, ComponentLink2URL=http://media.digikey.com/pdf/Data%20Sheets/Lite-On%20PDFs/LTST-C170GKT.pdf, DatasheetVersion=03/2003, Features=-, Height="1.1 mm", Height (Max)=1.10mm, Length="2 mm", Lens Style/Size="Rectangle with Flat Top, 1.40mm x 1.25mm", Lens Transparency=Clear, Manufacturer Part Number=LTST-C170GKT, Mount="Surface Mount", Mounting Technology="Surface Mount", Mounting Type="Surface Mount", PackageDescription="2-Pin Surface Mount Device, Body 2 x 1.25 mm", PackageReference=C170GKT, Packaging="Tape and Reel", Part Status=Active, Pins=2, Pricing 1="1=0.48, 10=0.351, 25=0.2588, 100=0.1848, 250=0.12564, 500=0.11086, 1000=0.08684 (CAD)", RoHS="RoHS Compliant", RoHSCompliant=true, Size / Dimension="2.00mm L x 1.25mm W", Stock 1=242288, Supplier 1=Digi-Key, Viewing Angle=130°, Wavelength - Dominant=569nm, Wavelength - Peak=565nm
F3 F5 F6 F7: library part "PTC fuse 80mA 0ZCM0008FF2G", "0ZCM0008FF2G", Supplier Part Number 1=507-1817-1-ND, Supplier 1=Digi-Key
F8: library part CMP-2000-05510-1, "Poly-Fuse(R) Resettable PTC, 24 V, 100 A, -40 to 85 degC, 2-Pin SMD, RoHS, Tape and Reel", Current Rating=100A, Hold Current=0.75A, Manufacturer=Littelfuse, Maximum Voltage=24VDC, Maximum Voltage DC=24V, Operating Temperature Range=-40Cto+85C, Package / Case=1812(4532metric), Package Description="2-Pin Surface Mount Device, Body 4.55 x 3.24 mm", Package Reference=1812L07524DR, Resistance=290mOhms, Trip Current=1.5A, Brand=Littelfuse, Current Rating (Max)=100A, Current Rating - Max=100A, Datasheet URL=http://www.littelfuse.com/~/media/electronics/datasheets/resettable_ptcs/littelfuse_ptc_1812l_datasheet.pdf.pdf, Datasheet Version=02/2016, Dimensions=4.37mmLx3.07mmWx0.75mmH, Factory Pack Quantity=1500, Manufacturer URL=http://www.littelfuse.com/, Mounting Style=SMD/SMT, Mounting Technology=SurfaceMount, Packaging=Reel, Product Category=ResettableFuses-PPTC, RoHS=Details, Series=1812L, Termination Style=SMD/SMT, Type=PolyFuseResettablePTC
L1: library part CMP-2000-06698-1, "Chip Bead, 600 Ohm, 1 A, -55 to 125 degC, 2-Pin SMD (0603), RoHS, Tape and Reel", Current Rating (Max)=1A, DC Resistance (DCR) (Max)=200mOhm, Impedance @ Frequency=600Ohm@100MHz, Manufacturer=Bourns, Operating Temperature=-55°C~125°C, Package / Case=0603(1608Metric), Package Description="2-Pin Surface Mount Device, Body 1.6 x 0.8 mm", Package Reference=0603, Ratings=-, Standard Package=1, Supplier Part Number 1=240-2371-1-ND, Category=Filters, Datasheet URL=http://www.bourns.com/docs/Product-Datasheets/mh.pdf, Datasheet Version=03/2015, EDA / CAD Models=DownloadfromAcceleratedDesigns, Family=FerriteBeadsandChips, Filter Type=Power,SignalLine, Manufacturer URL=http://www.bourns.com/, Mounting Technology=SurfaceMount, Mounting Type=SurfaceMount, Number of Lines=1, Online Catalog=MHSeries, Other Names=MH1608-601YCT, Packaging=CutTape(CT), RoHS Information=MH1608SeriesMaterialDeclaration, Series=MH, Supplier 1=Digi-Key
P1 P2: "Header, 2-Pin", LatestRevisionDate=17-Jul-2002, LatestRevisionNote="Re-released for DXP Platform.", Publisher="Altium Limited"
P3: "Header, 4-Pin", LatestRevisionDate=17-Jul-2002, LatestRevisionNote="Re-released for DXP Platform.", Publisher="Altium Limited"
P4: library part CMP-1502-01068-1, "THT Vertical Pin Header WR-PHD, Pitch 2.54 mm, Single Row, 5 pins", Contact Resistance=20mOhm, Manufacturer="Wurth Elektronik", Operating Temperature=-40to105degC, Rated Current=3A, Withstanding Voltage=500VAC, Working Voltage=250VAC, Datasheet URL=https://katalog.we-online.de/em/datasheet/6130xx11121.pdf, Gender=Male, Manufacturer URL=http://www.we-online.de, Mounting Technology=THT, Orientation=Vertical, Package Reference=61300511121, Packaging=Bag, Part Number=61300511121, Pin Number=5, Pitch=2.54mm, Publisher=WurthElektronik, Row Number=Single
Q1: library part CMP-2100-03638-1, "Single P-Channel, Logic Level, PowerTrench(R) MOSFET, 2 A, 20 V, -55 to 150 degC, 3-Pin SOT-23, RoHS, Tape and Reel", Case/Package=SOT-23, Continuous Drain Current (ID)=2A, Current Rating=-2A, Drain to Source Breakdown Voltage=-20V, Drain to Source Resistance=60mOhm, Drain to Source Voltage (Vdss)=20V, Gate to Source Voltage (Vgs)=8V, Input Capacitance=779pF, Manufacturer="Fairchild Semiconductor", Max Operating Temperature=150degC, Max Power Dissipation=500mW, Min Operating Temperature=-55degC, Package Description="3-Pin Small Outline Transistor, Body 2.92 x 1.4 mm, Pitch 0.95 mm", Package Quantity=1, Package Reference=SSOT3L, Package Version="Rev. 3, 05/2015", Threshold Voltage=-800mV, Contact Plating=Tin, Datasheet URL=https://www.fairchildsemi.com/datasheets/FD/FDN340P.pdf, Datasheet Version="Rev. E1, 02/2007", Element Configuration=Single, Fall Time=11ns, Height=0.94mm, Lead Free=LeadFree, Length=2.92mm, Manufacturer URL=https://www.fairchildsemi.com/, Mount=SurfaceMount, Number of Elements=1, Number of Pins=3, Package URL=https://www.fairchildsemi.com/package-drawings/MA/MA03B.pdf, Packaging=TapeandReel, Power Dissipation=500mW, Radiation Hardening=No, Rds On Max=70mOhm, REACH SVHC=NoSVHC, Rise Time=9ns, RoHSCompliant=true, Termination=SMD/SMT, Turn-Off Delay Time=27ns, Turn-On Delay Time=10ns, Voltage Rating (DC)=-20V, Width=3.05mm
R1: library part CMP-1012-00048-1, "82R 0.1W 5% 0603 (1608 Metric)  SMD", Case-EIA=0603, Case-Metric=1608, Power="0.1 W", Tolerance="5 %", Technology=SMT
R2: library part CMP-1012-00372-1, "60R4 0.1W 1% 0603 (1608 Metric)  SMD", Case-EIA=0603, Case-Metric=1608, Power="0.1 W", Tolerance="1 %", Technology=SMT
R3: library part CMP-1012-00038-1, "33R 0.1W 5% 0603 (1608 Metric)  SMD", Case-EIA=0603, Case-Metric=1608, Power="0.1 W", Tolerance="5 %", Technology=SMT
R4: library part CMP-1012-00098-1, "10K 0.1W 5% 0603 (1608 Metric)  SMD", Case-EIA=0603, Case-Metric=1608, Power="0.1 W", Tolerance="5 %", Technology=SMT
R5: "Resistor", Manufacturer="Panasonic Electronic Components", Manufacturer Part Number=ERJ-PA3F1001V, Operating Temperature="-55°C ~ 155°C", Package / Case="0603 (1608 Metric)", Power (Watts)="0.25W, 1/4W", Resistance (Ohms)=1k, Supplier Device Package=0603, Supplier Part Number 1=P1.0KBYCT-ND, Temperature Coefficient=±100ppm/°C, Tolerance=±1%, Category=Resistors, ComponentLink1Description=https://industrial.panasonic.com/cdbs/www-data/pdf/RDA0000/AOA0000C243.pdf, ComponentLink1URL=https://industrial.panasonic.com/cdbs/www-data/pdf/RDA0000/AOA0000C243.pdf, Composition="Thick Film", Failure Rate=-, Features="Automotive AEC-Q200, Pulse Withstanding", Height - Seated (Max)="0.022\" (0.55mm)", Number of Terminations=2, Packaging="Cut Tape (CT)", Part Status=Active, Pricing 1="1=0.22, 10=0.198, 25=0.138, 50=0.1072, 100=0.0765, 250=0.05972, 500=0.04746, 1000=0.03368 (CAD)", RoHS="RoHS Compliant", Size / Dimension="0.063\" L x 0.031\" W (1.60mm x 0.80mm)", Stock 1=56110, Supplier 1=Digi-Key
R6: "Resistor", Manufacturer=Yageo, Manufacturer Part Number=RC0603JR-07180RL, Operating Temperature="-55°C ~ 155°C", Package / Case="0603 (1608 Metric)", Power (Watts)="0.1W, 1/10W", Resistance (Ohms)=180, Supplier Device Package=0603, Supplier Part Number 1=311-180GRCT-ND, Temperature Coefficient=±100ppm/°C, Tolerance=±5%, Category=Resistors, ComponentLink1Description=http://www.yageo.com/NewPortal/yageodocoutput?fileName=/pdf/R-Chip/PYu-RC_Group_51_RoHS_L_4.pdf, ComponentLink1URL=http://www.yageo.com/NewPortal/yageodocoutput?fileName=/pdf/R-Chip/PYu-RC_Group_51_RoHS_L_4.pdf, Composition="Thick Film", Failure Rate=-, Features="Moisture Resistant", Height - Seated (Max)="0.022\" (0.55mm)", Number of Terminations=2, Packaging="Cut Tape (CT)", Part Status=Active, Pricing 1="1=0.16, 10=0.016, 25=0.0112, 50=0.0084, 100=0.0062, 250=0.0048, 500=0.00382, 1000=0.00281 (CAD)", RoHS="RoHS Compliant", Size / Dimension="0.063\" L x 0.031\" W (1.60mm x 0.80mm)", Stock 1=201936, Supplier 1=Digi-Key
R7: "Resistor", Manufacturer=Yageo, Manufacturer Part Number=RC0603JR-0782RL, Operating Temperature="-55°C ~ 155°C", Package / Case="0603 (1608 Metric)", Power (Watts)="0.1W, 1/10W", Resistance (Ohms)=82, Supplier Device Package=0603, Supplier Part Number 1=311-82GRCT-ND, Temperature Coefficient=±100ppm/°C, Tolerance=±5%, Category=Resistors, ComponentLink1Description=http://www.yageo.com/NewPortal/yageodocoutput?fileName=/pdf/R-Chip/PYu-RC_Group_51_RoHS_L_4.pdf, ComponentLink1URL=http://www.yageo.com/NewPortal/yageodocoutput?fileName=/pdf/R-Chip/PYu-RC_Group_51_RoHS_L_4.pdf, Composition="Thick Film", Failure Rate=-, Features="Moisture Resistant", Height - Seated (Max)="0.022\" (0.55mm)", Number of Terminations=2, Packaging="Cut Tape (CT)", Part Status=Active, Pricing 1="1=0.16, 10=0.016, 25=0.0112, 50=0.0084, 100=0.0062, 250=0.0048, 500=0.00382, 1000=0.00281 (CAD)", RoHS="RoHS Compliant", Size / Dimension="0.063\" L x 0.031\" W (1.60mm x 0.80mm)", Stock 1=72049, Supplier 1=Digi-Key
R9 R10 R28 R29: library part CMP-1012-00034-1, "22R 0.1W 5% 0603 (1608 Metric)  SMD", Case-EIA=0603, Case-Metric=1608, Power="0.1 W", Tolerance="5 %", Technology=SMT
R11 R30: library part CMP-1012-00052-1, "120R 0.1W 5% 0603 (1608 Metric)  SMD", Case-EIA=0603, Case-Metric=1608, Power="0.1 W", Tolerance="5 %", Technology=SMT
R43: "Resistor", Manufacturer=Yageo, Manufacturer Part Number=RT0603BRD0739KL, Operating Temperature="-55°C ~ 155°C", Package / Case="0603 (1608 Metric)", Power (Watts)="0.1W, 1/10W", Resistance (Ohms)=39k, Supplier Device Package=0603, Supplier Part Number 1=YAG1649CT-ND, Temperature Coefficient=±25ppm/°C, Tolerance=±0.1%, Category=Resistors, ComponentLink1Description=http://www.yageo.com/documents/recent/PYu-RT_1-to-0.05_RoHS_L_6.pdf, ComponentLink1URL=http://www.yageo.com/documents/recent/PYu-RT_1-to-0.05_RoHS_L_6.pdf, Composition="Thin Film", Failure Rate=-, Features="Moisture Resistant", Height - Seated (Max)="0.022\" (0.55mm)", Number of Terminations=2, Packaging="Cut Tape (CT)", Part Status=Active, Pricing 1="1=0.55, 10=0.464, 25=0.3376, 50=0.2446, 100=0.1814, 250=0.1392, 500=0.10966, 1000=0.07592 (CAD)", RoHS="RoHS Compliant", Size / Dimension="0.063\" L x 0.031\" W (1.60mm x 0.80mm)", Stock 1=2740, Supplier 1=Digi-Key
R44: "Resistor", Manufacturer=Yageo, Manufacturer Part Number=AT0603BRD072KL, Operating Temperature="-55°C ~ 155°C", Package / Case="0603 (1608 Metric)", Power (Watts)="0.1W, 1/10W", Resistance (Ohms)=2k, Supplier Device Package=0603, Supplier Part Number 1=YAG2112CT-ND, Temperature Coefficient=±25ppm/°C, Tolerance=±0.1%, Category=Resistors, ComponentLink1Description=http://www.yageo.com/documents/recent/PYu-AT_51_RoHS_L-3.pdf, ComponentLink1URL=http://www.yageo.com/documents/recent/PYu-AT_51_RoHS_L-3.pdf, Composition="Thin Film", Failure Rate=-, Features="Anti-Sulfur, Automotive AEC-Q200, Moisture Resistant", Height - Seated (Max)="0.022\" (0.55mm)", Number of Terminations=2, Packaging="Cut Tape (CT)", Part Status=Active, Pricing 1="1=0.59, 10=0.431, 25=0.3188, 50=0.235, 100=0.1725, 250=0.14248, 500=0.11746, 1000=0.08498 (CAD)", RoHS="RoHS Compliant", Size / Dimension="0.063\" L x 0.032\" W (1.60mm x 0.80mm)", Stock 1=1218, Supplier 1=Digi-Key
R45: "Resistor", Manufacturer=Yageo, Manufacturer Part Number=RT0603BRD0710KL, Operating Temperature="-55°C ~ 155°C", Package / Case="0603 (1608 Metric)", Power (Watts)="0.1W, 1/10W", Resistance (Ohms)=10k, Supplier Device Package=0603, Supplier Part Number 1=YAG1236CT-ND, Temperature Coefficient=±25ppm/°C, Tolerance=±0.1%, Category=Resistors, ComponentLink1Description=http://www.yageo.com/documents/recent/PYu-RT_1-to-0.05_RoHS_L_6.pdf, ComponentLink1URL=http://www.yageo.com/documents/recent/PYu-RT_1-to-0.05_RoHS_L_6.pdf, Composition="Thin Film", Failure Rate=-, Features="Moisture Resistant", Height - Seated (Max)="0.022\" (0.55mm)", Number of Terminations=2, Packaging="Cut Tape (CT)", Part Status=Active, Pricing 1="1=0.5, 10=0.42, 25=0.3048, 50=0.2212, 100=0.164, 250=0.12592, 500=0.0992, 1000=0.06867 (CAD)", RoHS="RoHS Compliant", Size / Dimension="0.063\" L x 0.031\" W (1.60mm x 0.80mm)", Stock 1=2958, Supplier 1=Digi-Key
R46: "Resistor", Manufacturer=Yageo, Manufacturer Part Number=RC0603JR-0710KL, Operating Temperature="-55°C ~ 155°C", Package / Case="0603 (1608 Metric)", Power (Watts)="0.1W, 1/10W", Resistance (Ohms)=10k, Supplier Device Package=0603, Supplier Part Number 1=311-10KGRCT-ND, Temperature Coefficient=±100ppm/°C, Tolerance=±5%, Category=Resistors, ComponentLink1Description=http://www.yageo.com/NewPortal/yageodocoutput?fileName=/pdf/R-Chip/PYu-RC_Group_51_RoHS_L_4.pdf, ComponentLink1URL=http://www.yageo.com/NewPortal/yageodocoutput?fileName=/pdf/R-Chip/PYu-RC_Group_51_RoHS_L_4.pdf, Composition="Thick Film", Failure Rate=-, Features="Moisture Resistant", Height - Seated (Max)="0.022\" (0.55mm)", Number of Terminations=2, Packaging="Cut Tape (CT)", Part Status=Active, Pricing 1="1=0.16, 10=0.016, 25=0.0112, 50=0.0084, 100=0.0062, 250=0.0048, 500=0.00382, 1000=0.00281 (CAD)", RoHS="RoHS Compliant", Size / Dimension="0.063\" L x 0.031\" W (1.60mm x 0.80mm)", Stock 1=2936292, Supplier 1=Digi-Key
R72 R73 R74 R75 R76 R77 R78 R79: "Resistor", LatestRevisionDate=17-Jul-2002, LatestRevisionNote="Re-released for DXP Platform.", PackageDescription="Axial Device, Thru-Hole; 2 Leads; 0.3 in Pin Spacing", PackageReference=AXIAL-0.3, Published=8-Jun-2000, Publisher="Altium Limited"
Ref1: Current - Cathode=-, Current - Output=10mA, Current - Supply=600µA, Digikey Part Number=LT6654AHS6-3.3#TRMPBFCT-ND, Manufacturer="Linear Technology", Operating Temperature="-40°C ~ 125°C (TA)", Package / Case="SOT-23-6 Thin, TSOT-23-6", Supplier Device Package=TSOT-23-6, Temperature Coefficient=10ppm/°C, Tolerance=±0.05%, Voltage - Input="3.8 V ~ 36 V", Voltage - Output (Min/Fixed)=3.3V, Category="Integrated Circuits (ICs)", ComponentLink1Description=http://www.linear.com/docs/29677, ComponentLink1URL=http://www.linear.com/docs/29677, Digikey Link=http://www.digikey.com/product-detail/en/linear-technology/LT6654AHS6-3.3-TRMPBF/LT6654AHS6-3.3-TRMPBFCT-ND/2485839, Manufacturer Part Number=LT6654AHS6-3.3, Mounting Type="Surface Mount", Noise - 0.1Hz to 10Hz=1.7ppmp-p, Noise - 10Hz to 10kHz=2ppmrms, Output Type=Fixed, Packaging="Cut Tape (CT)", Part Status=Active, Pricing 1="1=9.53, 25=8.508, 100=5.5596, 250=5.1048 (CAD)", Reference Type=Series, RoHS="RoHS Compliant", Stock 1=1315, Supplier 1=Digi-Key, Supplier Part Number 1=LT6654AHS6-3.3#TRMPBFCT-ND, Voltage - Output (Max)=-
REG1: "5V DCDC", Current - Output (Max)=1.5A, Manufacturer="Murata Power Solutions Inc.", Manufacturer Part Number=OKI-78SR-3.3/1.5-W36H-C, Operating Temperature="-40°C ~ 85°C", Package / Case="3-SIP Module", Power (Watts) - Manufacture Series=5W, Supplier Part Number 1=811-2196-5-ND, Voltage - Input (Max)=36V, Voltage - Input (Min)=7V, Voltage - Isolation=-, Voltage - Output 1=5V, Applications="ITE (Commercial)", Category="Power Supplies - Board Mount", ComponentLink1Description=http://power.murata.com/data/power/oki-78sr.pdf, ComponentLink1URL=http://power.murata.com/data/power/oki-78sr.pdf, Efficiency=85.5%, Features=SCP, Mounting Type="Through Hole", Number of Outputs=1, Packaging=Tray, Part Status=Active, Pricing 2="1=6.31, 5=6.248, 10=6.205, 25=6.1168, 50=5.9262, 100=5.5449, 250=5.28716 (CAD)", RoHS="RoHS Compliant", Size / Dimension="0.65\" L x 0.41\" W x 0.30\" H (16.5mm x 10.4mm x 7.6mm)", Stock 2=4108, Supplier 1=Digi-Key, Supplier 2=Digi-Key, Supplier Part Number 2=811-3014-ND, Type="Linear Regulator Replacement", Voltage - Output 2=-, Voltage - Output 3=-
REG2: library part OKI-78SR-5, "3.3V DCDC", Current - Output (Max)=1.5A, Manufacturer="Murata Power Solutions Inc.", Manufacturer Part Number=OKI-78SR-3.3/1.5-W36H-C, Operating Temperature="-40°C ~ 85°C", Package / Case="3-SIP Module", Power (Watts) - Manufacture Series=5W, Supplier Part Number 1=811-2196-5-ND, Voltage - Input (Max)=36V, Voltage - Input (Min)=7V, Voltage - Isolation=-, Voltage - Output 1=3.3V, Applications="ITE (Commercial)", Category="Power Supplies - Board Mount", ComponentLink1Description=http://power.murata.com/data/power/oki-78sr.pdf, ComponentLink1URL=http://power.murata.com/data/power/oki-78sr.pdf, Efficiency=85.5%, Features=SCP, Mounting Type="Through Hole", Number of Outputs=1, Packaging=Tray, Part Status=Active, Pricing 2="1=6.31, 5=6.248, 10=6.205, 25=6.1168, 50=5.9262, 100=5.5449, 250=5.28716 (CAD)", RoHS="RoHS Compliant", Size / Dimension="0.65\" L x 0.41\" W x 0.30\" H (16.5mm x 10.4mm x 7.6mm)", Stock 2=4108, Supplier 1=Digi-Key, Supplier 2=Digi-Key, Supplier Part Number 2=811-3014-ND, Type="Linear Regulator Replacement", Voltage - Output 2=-, Voltage - Output 3=-
U1: library part CMP-0243-00221-1, "ARM Cortex-M4 32-bit MCU+FPU, 512 KB Flash, 128 KB Internal RAM, 81 I/Os, 100-Pin LQFP, -40 to 105 degC, Tray", I/Os (High Current)=81, Operating Frequency(F) (Processor speed) (MHz)=180, Package Description=LQFP100, Package Reference="100-Pin Low Profile Quad Flat Package, Body 14 x 14 mm, Pitch 0.5 mm", Supply Voltage(Vcc) min (V)=1.7, ComponentLink1Description="Manufacturer URL", ComponentLink1URL=http://www.st.com/, ComponentLink2Description=Datasheet, ComponentLink2URL=http://www.st.com/st-web-ui/static/active/en/resource/technical/document/datasheet/DM00141306.pdf, Core="ARM Cortex-M4", D/A Converter=2, DatasheetVersion="Rev. 6", FLASH Size (Prog) (kB)=512, Internal RAM Size (kB)=128, Mounting Technology="Surface Mount", Packing=Tray, PartId=1
U2 U3: library part CMP-0315-00075-2, "3.3 V Can Transceiver, 17 mA, -40 to 85 degC, 8-pin SOIC (D), Green (RoHS & no Sb/Br)", Drivers Per Package=1, Manufacturer="Texas Instruments", Rating=Catalog, Supply Voltage(s)(V)=3.3, Code_JEDEC=MS-012AA, ComponentLink1Description=Datasheet, ComponentLink1URL=http://www.ti.com/general/docs/lit/getliterature.tsp?genericPartNumber=SN65HVD232&fileType=pdf, DatasheetVersion=SLOS346K, Eco-Plan="Green (RoHS & no Sb/Br)", ICC(Max)(mA)=17, Isolated=No, Mounting Technology="Surface Mount", PackageDescription="8-Pin Plastic Small Outline Integrated Circuit, 4.9 x 3.9 mm, Pitch 1.27 mm Pitch", PackageReference=D0008A, PackageVersion="revM, Jun-2011", PartNumber=SN65HVD232DR, Receivers Per Package=1, SubFamily=CAN, Transient Pulse Protection(V)="-25 to 25"

## Via types
v1: diameter 31, hole 17, Top Layer to Bottom Layer, 854 vias
v2: diameter 50, hole 28, Top Layer to Bottom Layer, 12 vias
v3: diameter 250, hole 137, Top Layer to Bottom Layer, 7 vias
v4: diameter 157.48, hole 137.8, Top Layer to Bottom Layer, 2 vias
v5: diameter 137.8, hole 118.11, Top Layer to Bottom Layer, 2 vias
v6: diameter 59.06, hole 39.37, Top Layer to Bottom Layer, 2 vias

## Nets (pads, with @x,y where several pads share a name; then routed paths per layer and width w, separated by ;. In a path a pad name is that pad's centre, name@x,y a point inside that pad or via, vN(x,y) a via of type N, cw(c..) or ccw(c..) an arc to the next point about the centre after c; other vN are vias at no path point)
3v3: C5.2 C6.2 C7.2 C8.2 C9.2 C18.2 C19.2 C23.2 C24.2 C25.2 CN1.7 D9.2 D10.2 D11.2 D18.2 D23.2 D25.1 D27.1 D29.1 D31.1 L1.1 P4.1 R7.1 REG2.3 U1.6 U1.11 U1.19 U1.28 U1.50 U1.75 U1.100 U2.3 U3.3 | length 21872.9
  Top Layer w10: C9.2@5757.87,5104.33 5808.31,5154.76 U1.100@5865.98,5154.76 5912.24,5154.76 6024.45,5266.97 ; C25.2@5860.24,5773.79 5866.31,5767.72 5887.8,5767.72 5927.24,5728.27 5927.24,5719.98 5926.1,5718.84 U1.75@5926.1,5687.17 ; U1.75@5926.02,5687.24 U1.75@5926.1,5687.17 ; U1.6@6024.45,5094.72 6024.45,5266.97 ; C6.2@6108.27,4998.03 6124.02,5013.78 6123.78,5013.78 6122.87,5014.69 U1.11@6122.87,5094.72 6122.87,5154.76 6183.9,5215.79 v1(6183.9,5426.42) ; C7.2@6255.91,4982.28 6272.56,4998.94 6272.56,5022.56 6281.5,5031.5 6281.5,5048.15 6280.43,5049.21 6280.43,5094.65 U1.19@6280.35,5094.72 6280.35,5329.96 v1(6183.9,5426.42) ; U1.28@6458.5,5194.13 6458.42,5194.21 6416.1,5194.21 6325.59,5284.72 6325.59,5333.94 6233.11,5426.42 v1(6183.9,5426.42) ; U1.50@6458.5,5627.2 6343.35,5627.2 6183.9,5467.76 v1(6183.9,5426.42) ; U1.28@6484.01,5194.06 6485.16,5192.91 6576.77,5192.91 C8.2@6590.55,5179.13 ; U1.50@6484.01,5627.2 6507.02,5627.2 6508.24,5625.98 6531.33,5625.98 C23.2@6586.61,5681.27 ; U1.75@5926.1,5687.17 5926.1,5621.22 6117.29,5430.03 6180.28,5430.03 6180.28,5422.8 6024.45,5266.97
  Top Layer w12: C8.2@6590.55,5192.91 6650,5133.46 6650,4795 6735,4710 7080,4710 7150,4780 7150,5025 7123.06,5051.94 7099.83,5051.94 D18.2@7094.37,5057.4
  Top Layer w15: v1(5175,4840) 5175,4835.67 5180,4830.67 C24.2@5180,4725 U3.3@5180,4631.87 ; U2.3@5480,4790.78 5480,4875 5481.62,4876.62 5481.62,4988.38 v1(5480,4990)
  Top Layer w20: P4.1@3485,3175 3485,3220 3585,3320 3585,4085 v2(4315,4815) 3615,5515 3615,5806.56 3703.44,5895 3798.28,5895 3810,5883.28 3810,5839.99 D25.1@3815,5834.99 3818.57,5838.56 4019.44,5838.56 D27.1@4025,5833 4144.7,5833 4145.27,5833.56 4264.97,5833.56 D31.1@4270,5828.53 4507.03,5828.53 D29.1@4510,5825.56 ; R7.1@5411.42,3964.57 5481.39,3964.57 5487.49,3970.67 5664.37,3970.67 REG2.3@5667.72,3967.32
  Bottom Layer w10: 4575,3830 4593.77,3811.23 4615.63,3811.23 D23.2@4620.63,3806.23 ; 4575,3985 4593.77,3966.23 D11.2@4617.69,3966.23 ; 4575,4140 4593.77,4121.23 D10.2@4619.75,4121.23 ; 4575,4346 D9.2@4620.63,4282.4 ; C5.2@6157.48,5352.36 6157.48,5311.02 6224.25,5244.25 6251.69,5244.25 L1.1@6252.44,5245